# Altium PCB PCB1.PcbDoc
Units mil, origin at the board's own origin, x right, y up, seen from the top; angles counter-clockwise.
Board outline 3680 x 3715 mil, 2 copper layers (Top Layer, Bottom Layer); 18 components, 40 nets, 133 pads, 30 vias.
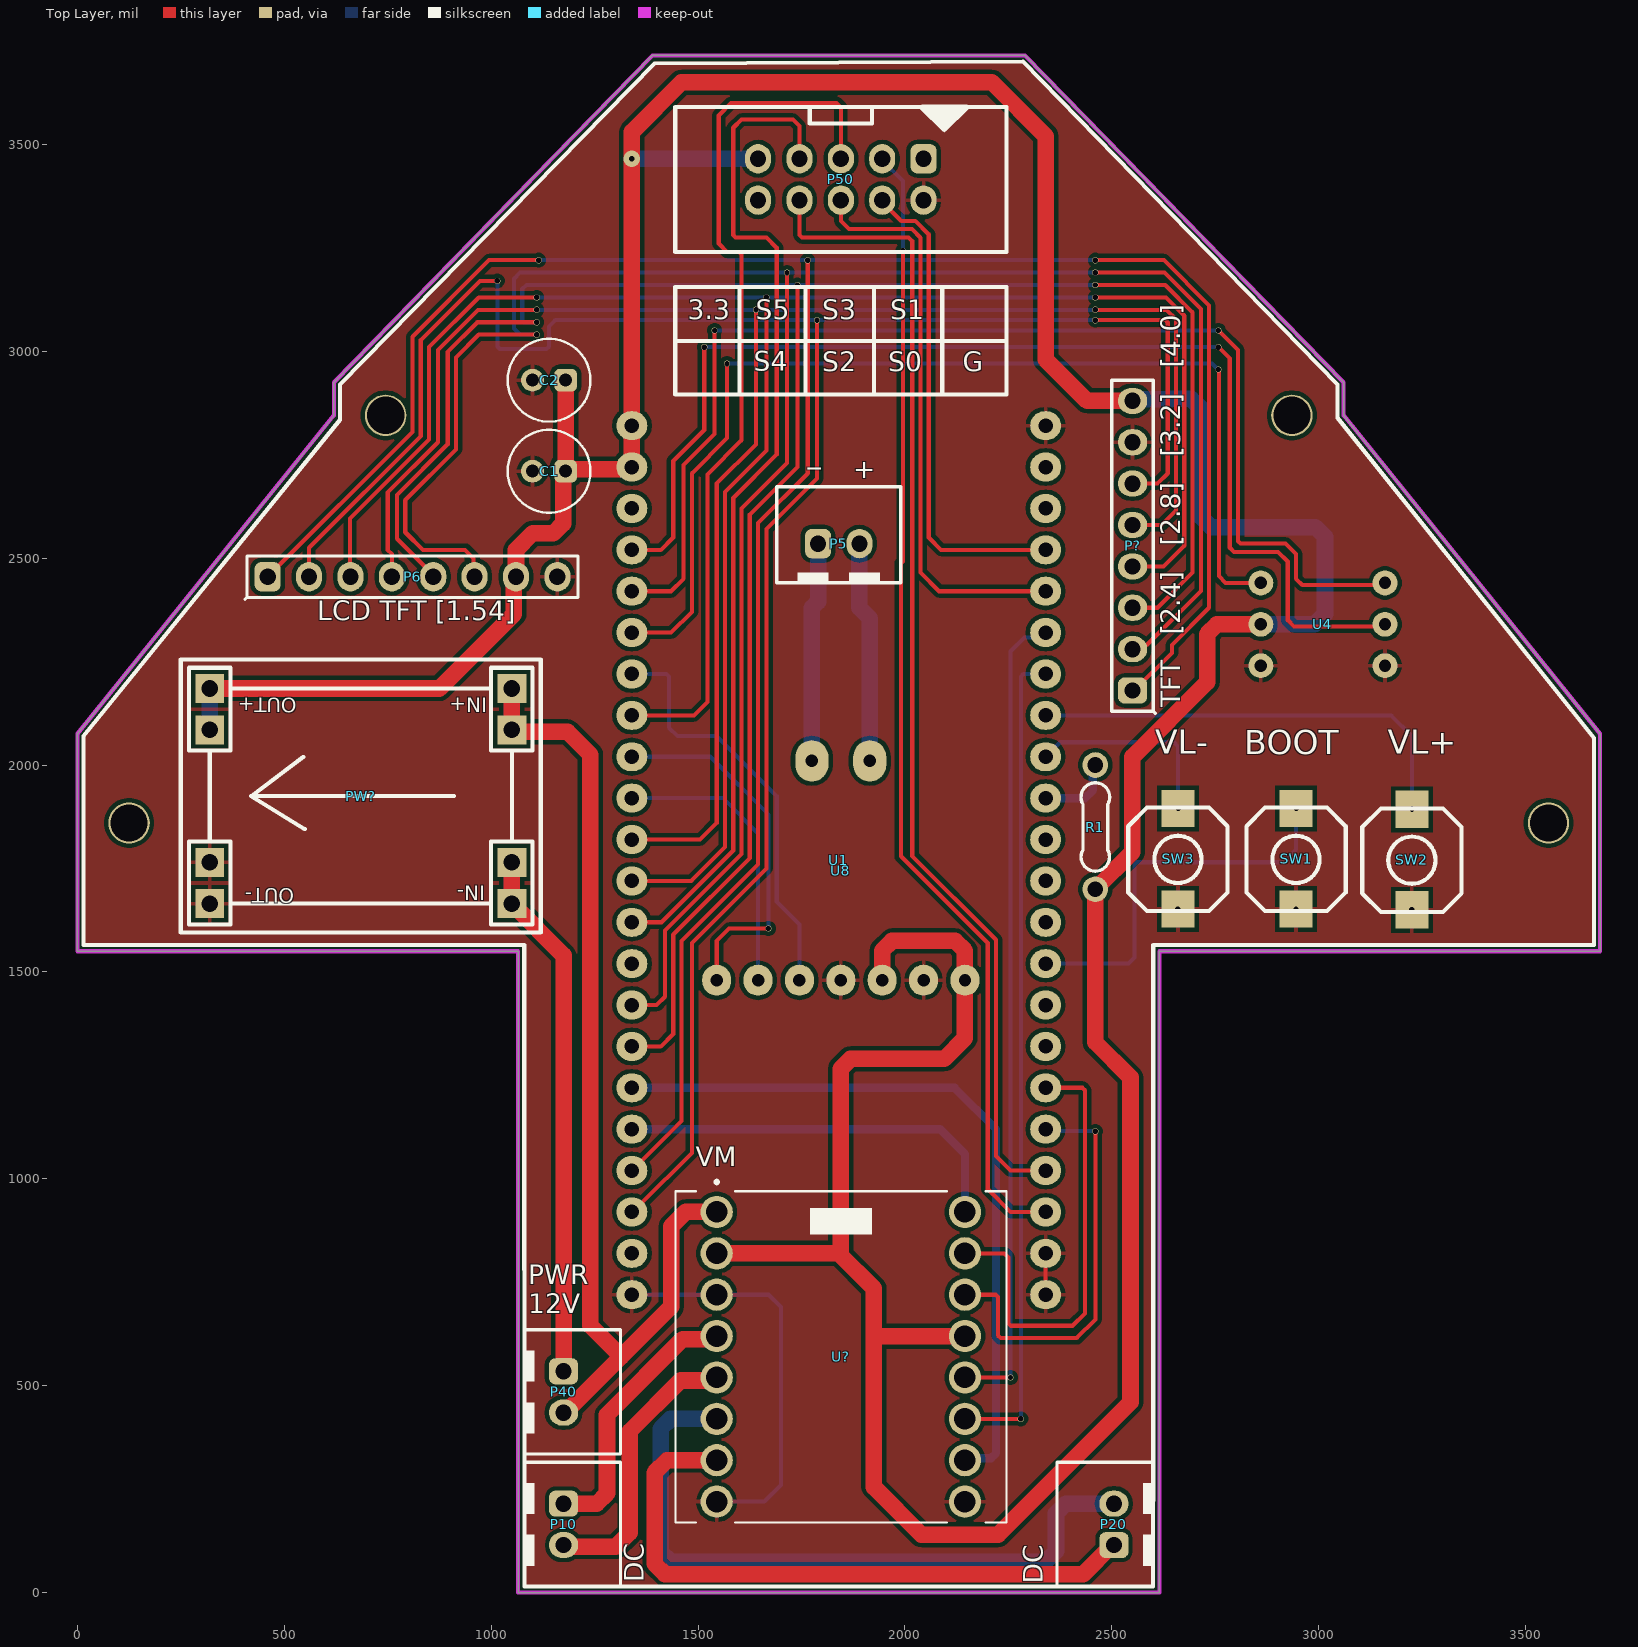
[diagram p0: Top Layer view]
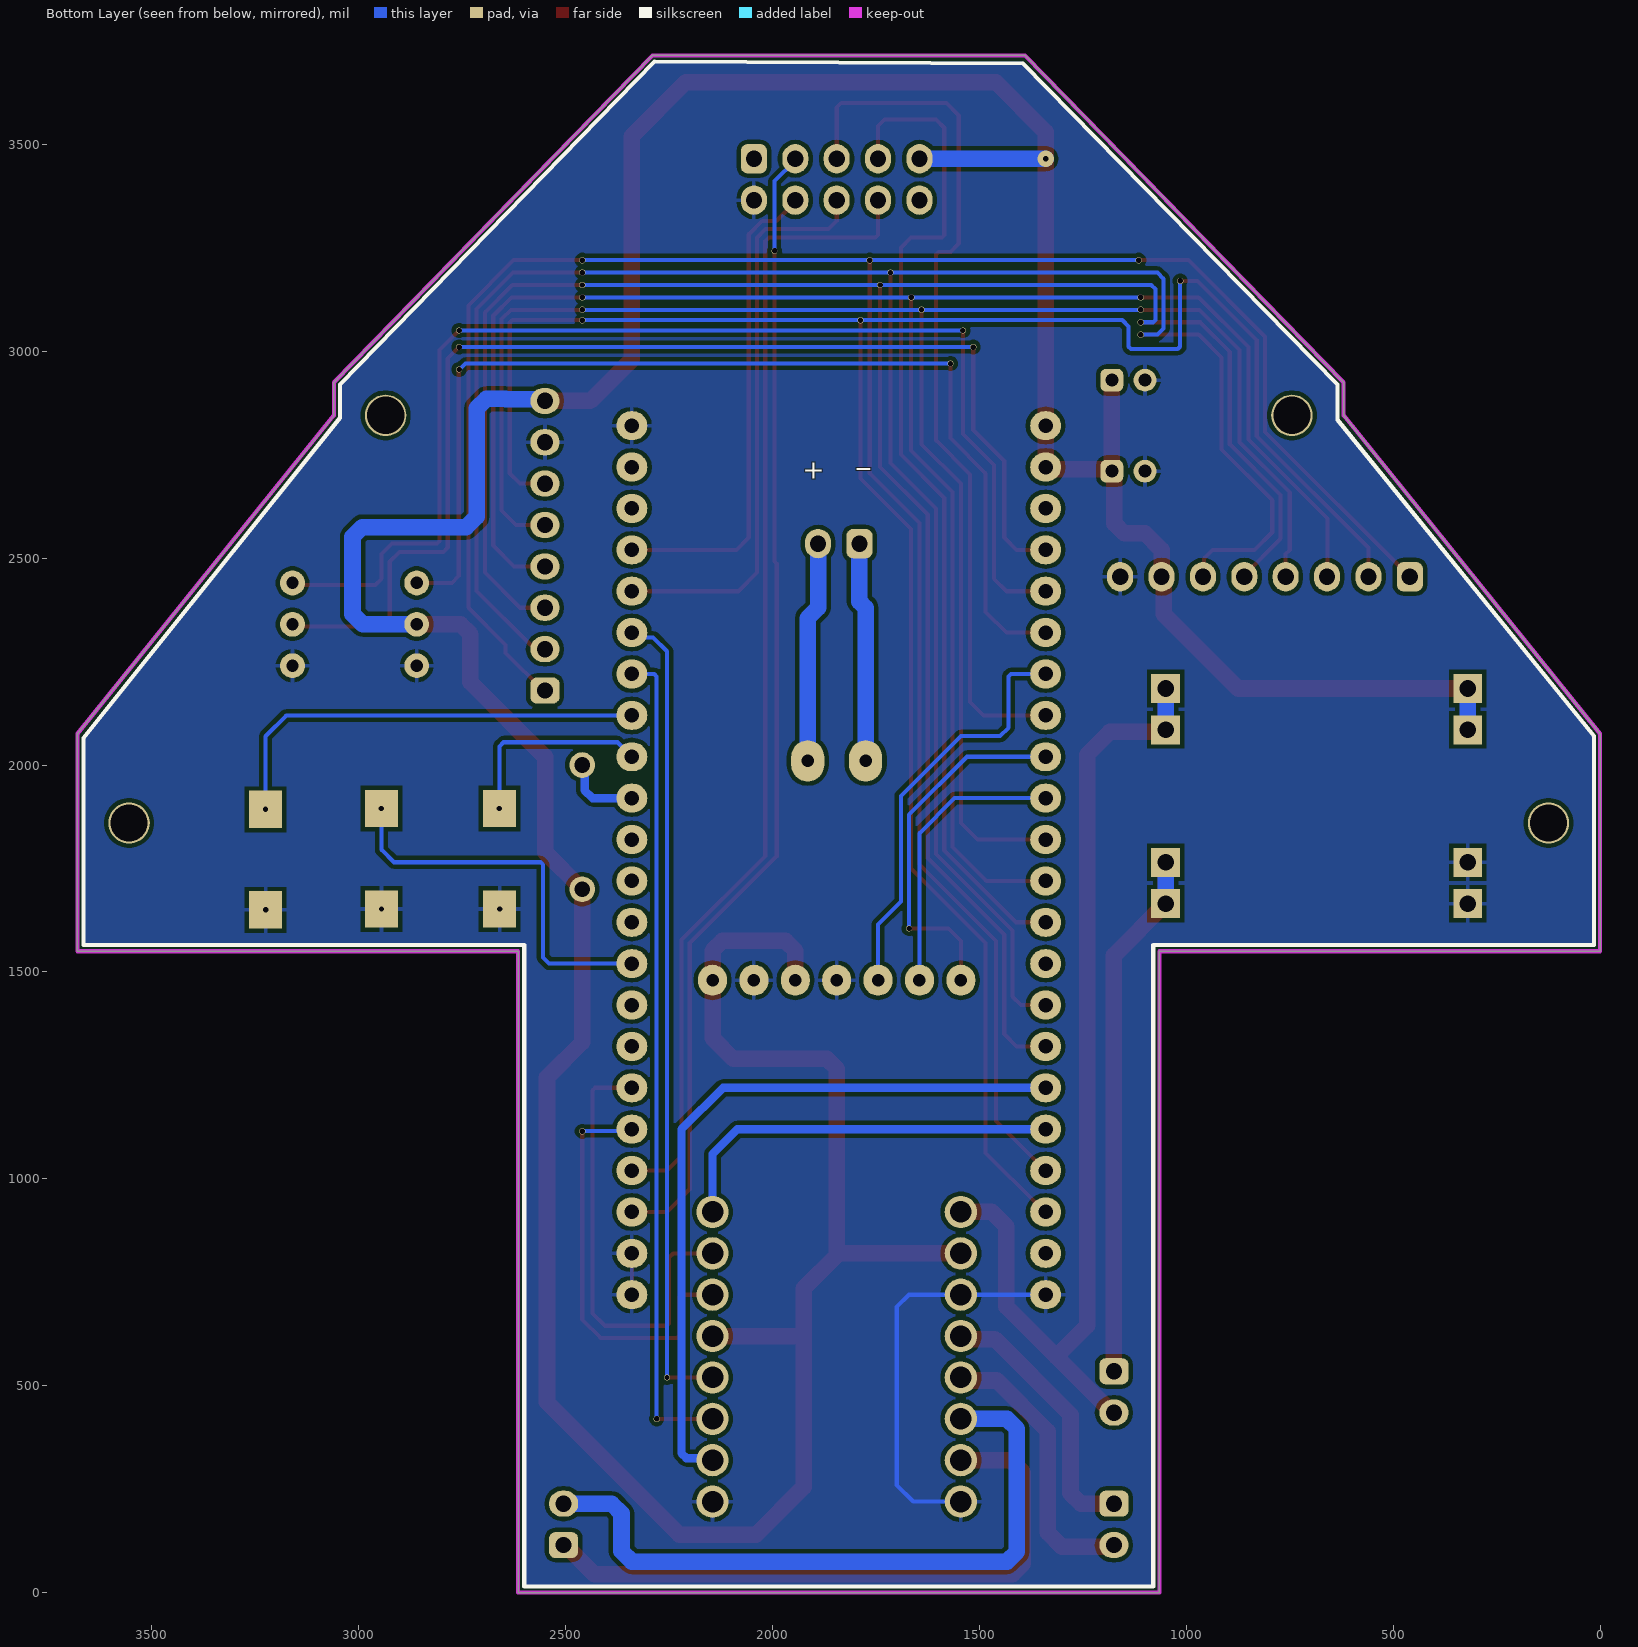
[diagram p1: Bottom Layer view, seen from below]

## Layer stack, top to bottom
Top Solder: solder mask 0.4, Solder Resist, Dk 3.5
Top Layer: signal copper 1.4
Dielectric 1: dielectric 12.6, FR-4, Dk 4.8
Bottom Layer: signal copper 1.4
Bottom Solder: solder mask 0.4, Solder Resist, Dk 3.5

## Board outline
0,1550 1065,1550 1065,0 2615,0 2615,1550 3680,1550 3680,2075 3060,2845 3060,2925 2290,3715 1390,3715 620,2925 620,2845 0,2075

## Design rules (kind name [scope] priority, off if disabled: settings)
Clearance [All] p1: gap=10 ignorepadtopadclearanceinfootprint=FALSE except(0: Arc-Hole Track-Hole SMDPad-Hole THPad-Hole Via-Hole Fill-Hole Poly-Hole Region-Hole Text-Hole)
PolygonConnect [All] p1: connectstyle=Relief reliefconductorwidth=10 reliefentries=4 polygonreliefangle="90 Angle" airgapwidth=10
RoutingVias [All] p1: holewidth=13 width=15 viastyle="Through Hole" minholewidth=13 minwidth=15 maxholewidth=13 maxwidth=15
SolderMaskExpansion [IsVia] p1: expansion=-1 istentingtop=FALSE
Width [All] p1: maxlimit=40 minlimit=10 preferedwidth=20
30 further rules are at their usual default settings.

## Components (designator, comment, footprint, x,y, rotation, side; value= is the part's Value field where it differs from the comment)
C1 "C" CYL/D.200/LS.75 1140,2710 r180 top
C2 "C" CYL/D.200/LS.75 1140,2930 r180 top
P5 "LOA" HDR/Header/2/BOX 1840,2535 r90 top
P6 "Header 8" HDR/Header/8 810,2455 r0 top
P10 "MOTORA" HDR/Header/2/BOX 1175,165 r0 top
P20 "MOTORB" HDR/Header/2/BOX 2505,165 r180 top
P40 "POWER" HDR/Header/2/BOX 1175,485 r0 top
P50 "BOX SENSOR" HDR/Header/10/DL/BOX 1845,3415 r0 top
P? "Header 8" HDR/Header/8 2550,2530 r90 top
PW? "MP1584" MP1548 1050,2185 r180 top
R1 "10K" "R 1/4W/300" 2460,1700 r90 top
SW1 "Button 2pin" Button2Psilicon 2945,1652.05 r90 top
SW2 "Button 2pin" Button2Psilicon 3225,1650 r90 top
SW3 "Button 2pin" Button2Psilicon 2659.63,1652.05 r90 top
U1 "ESP32_S3_MODULE" ESP32_S3_MODULE 1340,720 r90 top
U4 "MIC_IMP441" IMP441 2860,2440 r0 top
U8 "MAX98357" MAX98357 1545,1480 r0 top
U? "ROB-14450" MODULE_ROB-14450 1845,570 r0 top

## Footprints (in the part's own frame and the unit in brackets; to place one, negate y for a bottom-side part, rotate by r counter-clockwise, add the part's x,y. Pads: shape width x height; smd on the part's side, far side on the other; paste and mask are expansions set on the pad)
Button2Psilicon [mil]
  rect 90x80 hole 13: 1(0,0) 2(242.95,-0.37)
  silkscreen extent -5,-120 245,120, body extent -4,-116 244,116, height 195
CYL/D.200/LS.75 [mm]
  rrect50% 1.4x1.4 hole 0.8: 1(-1.016,0)
  round 1.4 hole 0.8: 2(1.016,0)
  silkscreen extent -2.54,-2.54 2.54,2.54, body extent -2.5,-2.5 2.5,2.5, height 11
ESP32_S3_MODULE [mil]
  oval 70x75 hole 35: 0(0,0) 1(100,0) 2(200,0) 3(300,0) 4(400,0) 5(500,0) 6(600,0) 7(700,0) 8(800,0) 9(900,0) 10(1000,0) 11(1100,0) 12(1200,0) 13(1300,0) 14(1400,0) 15(1500,0) 16(1600,0) 17(1700,0) 18(1800,0) 19(1900,0) 20(2000,0) 21(2100,0) 22(0,-1000) 23(100,-1000) 24(200,-1000) 25(300,-1000) 26(400,-1000) 27(500,-1000) 28(600,-1000) 29(700,-1000) 30(800,-1000) 31(900,-1000) 32(1000,-1000) 33(1100,-1000) 34(1200,-1000) 35(1300,-1000) 36(1400,-1000) 37(1500,-1000) 38(1600,-1000) 39(1700,-1000) 40(1800,-1000) 41(1900,-1000) 42(2000,-1000) 43(2100,-1000)
  body extent -100,-1050 2421,50, height 426
HDR/Header/2/BOX [mm]
  rrect50% 1.8x1.6 hole 1: 1(0,1.27)
  oval 1.8x1.6 hole 1: 2(0,-1.27)
  silkscreen extent -2.41,-3.81 3.5,3.81, body extent -2.35,-3.7 3.4,3.7, height 7
HDR/Header/8 [mm]
  rrect50% 1.6x1.8 hole 1: 1(-8.89,0)
  oval 1.6x1.8 hole 1: 2(-6.35,0) 3(-3.81,0) 4(-1.27,0) 5(1.27,0) 6(3.81,0) 7(6.35,0) 8(8.89,0)
  silkscreen extent -10.29,-1.4 10.16,1.27, body extent -10.16,-1.27 10.16,1.27, height 8.89
HDR/Header/10/DL/BOX [mm] "10 pins Male Box Header, IDC Socket"
  rrect50% 1.6x1.8 hole 1: 1(5.08,1.27)
  oval 1.6x1.8 hole 1: 2(5.08,-1.27) 3(2.54,1.27) 4(2.54,-1.27) 5(0,1.27) 6(0,-1.27) 7(-2.54,1.27) 8(-2.54,-1.27) 9(-5.08,1.27) 10(-5.08,-1.27)
  silkscreen extent -10.16,-4.44 10.16,4.58, body extent -10.16,-4.81 10.16,4.66, height 9.27
IMP441 [mil]
  round 60 hole 30: 0(0,0) 1(0,-100) 2(0,-200) 3(300,0) 4(300,-100) 5(300,-200)
  body extent -122,-382 420,178, height 411
MAX98357 [mil]
  oval 70x75 hole 30: 0(0,0) 1(100,0) 2(200,0) 3(300,0) 4(400,0) 5(500,0) 6(600,0)
  oval 80x100 hole 30: 7(230,530) 8(370,530)
  body extent -54,-99 654,665, height 656
MODULE_ROB-14450 [mm]
  round 1.98 hole 1.32: 1(-7.62,8.89) 2(-7.62,6.35) 3(-7.62,3.81) 4(-7.62,1.27) 5(-7.62,-1.27) 6(-7.62,-3.81) 7(-7.62,-6.35) 8(-7.62,-8.89) 9(7.62,-8.89) 10(7.62,-6.35) 11(7.62,-3.81) 12(7.62,-1.27) 13(7.62,1.27) 14(7.62,3.81) 15(7.62,6.35) 16(7.62,8.89)
  silkscreen extent -10.16,-10.16 10.16,10.83, body extent -10.16,-10.16 10.16,10.16, height 5.5
MP1548 [mil]
  rect 70x70 hole 40: 0(0,100) 0(0,0) 1(0,520) 1(0,420) 2(730,0) 2(730,100) 3(730,520) 3(730,420)
  silkscreen extent -70,-70 800,590, body extent -70,-71 800,591, height 161
"R 1/4W/300" [mil] "Through hole resitor, axial 300mils, 1/4W"
  round 62 hole 38: 1(0,0) 2(300,0)
  silkscreen extent 44,-35 257,35, body extent -12,-47 312,47, height 97

## Part data
C1 C2: library part Capacitor, "Capacitor pol"
P5 P10 P20 P40: library part "Header 2", "Header, 2-Pin"
P6 P?: "Header, 8-Pin"
P50: library part "Header 5X2", "Header, 5-Pin, Dual row"
R1: library part Resistor, "Resistor"
SW1 SW2 SW3: library part "Silicone 2P button SMD"
U?: "TB6612FNG Motor Controller/Driver Power Management Evaluation Board", Package=None, Availability="In Stock", Check_prices=https://www.snapeda.com/parts/ROB-14450/SparkFun%20Electronics/view-part/2656367/?ref=eda, MF="SparkFun Electronics", MP=ROB-14450, Price=None, SnapEDA_Link=https://www.snapeda.com/parts/ROB-14450/SparkFun%20Electronics/view-part/2656367/?ref=snap

## Free pads (board coordinates)
  round 100 hole 90: 70(745,2845) 71(2935,2845) 76(125,1860) 77(3555,1860)

## Via types
v1: diameter 15, hole 13, Top Layer to Bottom Layer, 29 vias
v2: diameter 40, hole 13, Top Layer to Bottom Layer, 1 vias

## Nets (pads, with @x,y where several pads share a name; then routed paths per layer and width w, separated by ;. In a path a pad name is that pad's centre, name@x,y a point inside that pad or via, vN(x,y) a via of type N, cw(c..) or ccw(c..) an arc to the next point about the centre after c; other vN are vias at no path point)
3.3: C1.1 C2.1 P6.7 P50.9 P?.8 PW?.2 R1.1 U1.20 U1.21 U4.1 U8.4 U8.6 U?.2 U?.13 | length 11194
  Top Layer w40: PW?.2@320,2185 875,2185 1055,2365 1055,2429.81 1055.6,2430.41 1055.6,2450.6 P6.7 ; P6.7@1050,2455 1060,2465 1060,2520 1100,2560 1150.58,2560 1174.01,2583.43 1174.01,2704.01 C1.1 ; C2.1@1175,2925 C2.1 C1.1 ; U?.2 1840,820 ; U8.4 1945,1551.57 1968.43,1575 2121.57,1575 2145,1551.57 2145,1340 2095,1290 1868.43,1290 1845,1266.57 1845,825 1840,820 ; U?.13 1930,620 1925,625 ; P?.8 2460,2880 2440,2880 2340,2980 2340,3520 2210,3650 1460,3650 1340,3530 v2(1340,3465) U1.21 U1.20 1335,2715 1185,2715 C1.1 ; U4.1 2753.43,2340 2730,2316.57 2730,2200 2549.6,2019.6 2549.6,1789.6 R1.1 2460,1330 2545,1245 2545,460 2225,140 2040,140 1925,255 1925,625 ; 1840,820 1925,735 1925,625
  Bottom Layer w40: PW?.2@320,2085 PW?.2@320,2185 ; v2(1340,3465) P50.9 ; P?.8 2554.4,2884.4 2644.56,2884.4 2645.16,2885 2691.57,2885 2715,2861.57 2715,2600 2740,2575 2991.57,2575 3015,2551.57 3015,2365 2990,2340 U4.1
+12: P40.2 PW?.0 U?.1 | length 2584.7
  Top Layer w40: PW?.0@1050,2185 1050,2085 1055,2080 1185,2080 1240,2025 1240,645 1314.47,570.53 ; P40.2 1178.94,435 1314.47,570.53 ; U?.1 1470,920 1435,885 1435,691.06 1314.47,570.53
  Bottom Layer w40: PW?.0@1050,2085 PW?.0@1050,2185
AI1: U1.26 U?.14 | length 1008.8
  Top Layer w10: U?.14 2219.14,720 2225,714.14 2225,620.86 2230.86,615 2415,615 2460,660 v1(2460,1115)
  Bottom Layer w10: U1.26 2344.04,1115.96 2459.04,1115.96 v1(2460,1115)
AI2: U1.27 U?.15 | length 1104.7
  Top Layer w10: U?.15 2240,820 2250,810 2250,650.86 2255.86,645 2405,645 2435,675 2435,1214.14 2429.14,1220 U1.27
BCK: U1.12 U8.1 | length 695.2
  Bottom Layer w10: U1.12 1560,1920 1645,1835 U8.1
BI1: U1.38 U?.12 | length 1968.6
  Top Layer w10: U?.12 v1(2255,520)
  Bottom Layer w10: v1(2255,520) 2255,2275 2288.52,2308.52 2328.52,2308.52 U1.38
BI2: U1.37 U?.11 | length 1991.6
  Top Layer w10: U?.11 v1(2280,420)
  Bottom Layer w10: v1(2280,420) 2280,2214.14 2285.86,2220 U1.37
BL: P6.1 P?.1 U1.3 | length 6171.6
  Top Layer w10: P6.1@450,2445 P6.1 810,2805 810,3035 995,3220 v1(1115,3220) ; U1.3 1460,1140 1460,1575 1645,1760 1645,2585 1765,2705 v1(1765,3220) ; v1(2460,3220) 2625.56,3220 2735,3110.56 2735,2380 2645,2290 2645,2271.06 2553.94,2180 P?.1
  Bottom Layer w10: v1(1115,3220) v1(1765,3220) v1(2460,3220)
BOOT: SW1.2 U1.30 | length 950.4
  Bottom Layer w10: U1.30 2540,1520 2555,1535 2555,1759.14 2560.86,1765 2915,1765 2945.37,1795.37 SW1.2
CS: P6.2 P?.6 U1.2 | length 5611.3
  Top Layer w10: P6.2 560,2525 830,2795 830,3026.72 973.28,3170 v1(1015,3170) ; U1.2 1360,920 1360,937.5 1485,1062.5 1485,1570 1665,1750 1665,2570 1787.5,2692.5 v1(1787.5,3075) ; v1(2460,3075) 2629.14,3075 2635,3069.14 2635,2705 2610,2680 P?.6 P?.6@2520,2680
  Bottom Layer w10: v1(1015,3170) 1015,3010.86 1020.86,3005 1134.14,3005 1140,3010.86 1140,3060 1155,3075 v1(1787.5,3075) v1(2460,3075)
DC: P6.3 P?.4 U1.10 | length 4887.5
  Top Layer w10: P6.3 659.14,2455.86 659.14,2595.86 850,2786.72 850,3010 970,3130 v1(1110,3130) ; U1.10 1483.43,1720 1565,1801.57 1565,2660 1665,2760 v1(1665,3130) ; v1(2460,3130) 2630.71,3130 2675,3085.71 2675,2530 2625,2480 P?.4 P?.4@2520,2480
  Bottom Layer w10: v1(1110,3130) v1(1665,3130) v1(2460,3130)
DIN: U1.15 U8.2 | length 1012.7
  Bottom Layer w10: U1.15 1424.14,2220 1430,2214.14 1430,2090 1450,2070 1545,2070 1690,1925 1690,1670 1745,1615 U8.2
GND: C1.2 C2.2 P6.8 P50.2 P?.7 PW?.3 SW1.1 SW2.1 SW3.1 U1.0 U1.22 U1.23 U1.43 U4.2 U4.5 U8.3 U8.5 U?.3 U?.8 U?.9 | length 1074
  Top Layer w10: U1.22 U1.23
  Bottom Layer w10: U1.0 U?.3 1670,720 1700,690 1700,260 1660,220 U?.8
GPIO_46: U1.8
GPIO_48: U1.28
LCK: U1.13 U8.0 | length 895.4
  Top Layer w10: U8.0 1545,1575 1575,1605 v1(1670,1605)
  Bottom Layer w10: U1.13 1530,2020 1670,1880 v1(1670,1605)
LOA+: P5.2 U8.8 | length 535.4
  Bottom Layer w40: P5.2 1890,2380 1915,2355 U8.8
LOA-: P5.1 U8.7 | length 531.2
  Bottom Layer w40: U8.7 1775,2380 1790,2395 P5.1
MIC_SCK: U1.17 U4.3 | length 2950.9
  Top Layer w10: U1.17 1435,2420 1465,2450 1465,2725 1540,2800 v1(1540,3050) ; v1(2757.5,3050) 2805,3002.5 2805,2540.86 2810.86,2535 2920,2535 2945,2510 2945,2450 2960,2435 3155,2435 U4.3
  Bottom Layer w10: v1(1540,3050) v1(2757.5,3050)
MIC_SD: U1.16 U4.0 | length 2602.3
  Top Layer w10: U1.16 1435,2320 1485,2370 1485,2705 1570,2790 v1(1570,2970) ; v1(2757.5,2955.68) 2758.46,2954.72 2758.46,2456.54 2775,2440 U4.0
  Bottom Layer w10: v1(1570,2970) 2741.83,2970 2756.15,2955.68 v1(2757.5,2955.68)
MIC_WS: U1.18 U4.4 | length 2881.2
  Top Layer w10: U1.18 1410,2520 1440,2550 1440,2735 1515,2810 v1(1515,3010) ; v1(2757.5,3010) 2785,2982.5 2785,2525 2795,2515 2901.72,2515 2925,2491.72 2925,2350 2940,2335 3155,2335 U4.4
  Bottom Layer w10: v1(1515,3010) v1(2757.5,3010)
NetP10_1: P10.1 U?.4 | length 649.1
  Top Layer w40: P10.1 1255,215 1280,240 1280,430 1462.74,612.74 1537.74,612.74 U?.4
NetP10_2: P10.2 U?.5 | length 684.9
  Top Layer w40: P10.2 1179.4,110.6 1300.6,110.6 1335,145 1335,390 1457.74,512.74 1537.74,512.74 U?.5
NetP20_1: P20.1 U?.7 | length 1531.8
  Top Layer w40: U?.7 1425,320 1395,290 1395,70 1420,45 2431.06,45 2501.06,115 P20.1
NetP20_2: P20.2 U?.6 | length 1659.2
  Bottom Layer w40: U?.6 1433.43,420 1410,396.57 1410,98.43 1433.43,75 2340,75 2365,100 2365,191.57 2388.43,215 P20.2
NetP40_1: P40.1 PW?.1 | length 1381.8
  Top Layer w40: PW?.1@1050,1765 1050,1665 1175,1540 P40.1
  Bottom Layer w40: PW?.1@1050,1665 PW?.1@1050,1765
NetR1_2: R1.2 U1.34 | length 185.4
  Bottom Layer w20: U1.34 2435,1920 2454,1939 2454,1994 R1.2
PWMA: U1.4 U?.16 | length 969.9
  Bottom Layer w20: U1.4 2085,1120 2145,1060 U?.16
PWMB: U1.5 U?.10 | length 1786.6
  Bottom Layer w20: U1.5 2120,1220 2220,1120 2220,336.72 2208.28,325 2150,325 U?.10
RST: P6.4 P?.5 U1.11 | length 4548.5
  Top Layer w10: P6.4 760,2510 750,2520 750,2658.43 871.64,2780.07 871.64,3003.36 968.28,3100 v1(1110,3100) ; U1.11 1505,1820 1545,1860 1545,2680 1640,2775 v1(1640,3100) ; v1(2460,3100) 2632.43,3100 2655,3077.43 2655,2615 2620,2580 P?.5@2520,2580
  Bottom Layer w10: v1(1110,3100) v1(1640,3100) v1(2460,3100)
S0: P50.4 U1.40 | length 1176.4
  Top Layer w10: P50.4 1945,3361.06 1991.06,3315 2025,3315 2057.5,3282.5 2057.5,2550 2087.5,2520 U1.40
S1: P50.3 U1.24 | length 2762.5
  Top Layer w10: v1(1995,3242.5) 1995,2491.82 1990,2486.82 1990,1779.5 2200,1569.5 2200,975 2255,920 U1.24
  Bottom Layer w10: P50.3 1945,3461.06 1995,3411.06 v1(1995,3242.5)
S2: P50.6 U1.39 | length 1390
  Top Layer w10: P50.6 1845,3314.57 1864.57,3295 2016.72,3295 2037.5,3274.22 2037.5,2465 2082.5,2420 U1.39
S3: P50.5 U1.14 | length 2123.6
  Top Layer w10: U1.14 1490,2120 1522.5,2152.5 1522.5,2702.5 1605,2785 1605,3234.14 1599.14,3240 1570,3240 1550,3260 1550,3570 1580,3600 1834.14,3600 1845,3589.14 P50.5
S4: P50.8 U1.25 | length 2792.1
  Top Layer w10: P50.8 1745,3280.86 1750.86,3275 2008.43,3275 2017.5,3265.93 2017.5,1780.28 2220,1577.78 2220,1055 2255,1020 U1.25
S5: P50.7 U1.9 | length 2447.9
  Top Layer w10: U1.9 1411.72,1620 1585,1793.28 1585,2645 1690,2750 1690,3250 1665,3275 1590.86,3275 1585,3280.86 1585,3540 1605,3560 1729.14,3560 1745,3544.14 P50.7
SCL: P6.6 P?.2 U1.7 | length 5699.7
  Top Layer w10: P6.6 957.49,2457.51 957.49,2499.58 937.06,2520 835,2520 792.43,2562.57 792.43,2640 915,2762.57 915,2985 970,3040 v1(1110,3040) ; U1.7 1400,1420 1420,1440 1420,1600 1605,1785 1605,2620 1715,2730 v1(1715,3190) ; v1(2460,3190) 2627.28,3190 2715,3102.28 2715,2420.86 2584.28,2290.14 2530.14,2290.14 P?.2@2525,2285
  Bottom Layer w10: v1(1110,3040) 1070,3040 1055,3055 1055,3175 1070,3190 v1(1715,3190) v1(2460,3190)
SDA: P6.5 P?.3 U1.6 | length 5524.1
  Top Layer w10: P6.5 860,2459.21 772.43,2546.78 772.43,2652.57 895,2775.15 895,2998.43 966.57,3070 v1(1110,3070) ; U1.6 1410,1320 1440,1350 1440,1590 1625,1775 1625,2605 1740,2720 v1(1740,3160) ; v1(2460,3160) 2628.99,3160 2695,3093.99 2695,2465 2610,2380 P?.3 P?.3@2520,2380
  Bottom Layer w10: v1(1110,3070) 1080.86,3070 1075,3075.86 1075,3150 1085,3160 v1(1740,3160) v1(2460,3160)
VL+: SW2.2 U1.36 | length 1082.9
  Bottom Layer w10: U1.36 3175,2120 3225.37,2069.63 SW2.2
VL-: SW3.2 U1.35 | length 488.6
  Bottom Layer w10: U1.35 2375,2055 2650,2055 2660,2045 SW3.2
pads on no net: P50.1 P50.10 U1.1 U1.19 U1.29 U1.31 U1.32 U1.33 U1.41 U1.42

## Polygon pours and split planes (outlines as drawn)
GND on Top Layer "NONET_L-01_P-001" (solid, remove dead copper, pour order 0): -470,4520 -110,4160 4890,4160 4890,-1050 4470,-1470 3910,-910 -1310,-910
GND on Bottom Layer "NONET_L-01_P-001" (solid, remove dead copper, pour order 1): -480,4030 -220,3770 5315,3770 5315,965 3865,-485 -785,-485

## Keep-outs
Keep-Out Layer:
  lines w10: 0,1550 1065,1550 1065,0 2615,0 2615,1550 3425,1550 3680,1550 3680,2075 3060,2845 3060,2925 2290,3715 1390,3715 620,2925 620,2845 0,2075 0,1550

## Silkscreen, mask and mechanical layers (free items; w line width, h text height)
Top Overlay:
  rectangle: 1770,865 1920,930
  lines w10: 1445,3025 2245,3025 ; 1600,2900 1600,3155 ; 1760,2895 1760,3155 ; 1925,2895 1925,3155 ; 2090,2895 2090,3155 ; 15,1565 1080,1565 1080,1540 1080.51,15 2599.49,15 2600,425 2600,1565 2725,1565 3665,1565 3665,2065 3045,2840 3045,2920 2285,3700 1395,3695 635,2920 635,2835 15,2070 15,1565 ; 1445,2895 1445,2925 1445,3155 1465,3155 2245,3155 2245,2895 1445,2895
  text "3.3" at 1475,3061.61 h80
  text "S5" at 1640,3060.94 h80
  text "S3" at 1800,3060.94 h80
  text "S1" at 1965,3060.94 h80
  text "S4" at 1635,2936.61 h80
  text "S2" at 1800,2935.94 h80
  text "S0" at 1960,2935.94 h80
  text "G" at 2140,2935.94 h80
  text "_" at 1765,2714.15 h80
  text "+" at 1875,2677.62 h80
  text "LCD TFT [1.54]" at 580,2334.43 h80
  text "TFT   [2.4]   [2.8]   [3.2]   [4.0]" at 2680.57,2140 h80 r90
  text "VL-" at 2605,2008 h100
  text "VL+" at 3166.86,2008 h100
  text "BOOT" at 2820,2006.96 h100
  text "VM" at 1495,1015 h80
  text "PWR" at 1090,730 h80
  text "12V" at 1090,660 h80
  text "DC" at 1384.11,25 h80 r90
  text "DC" at 2349.1,22.06 h80 r90
Bottom Overlay:
  lines w10: 15,1565 1080,1565 1080,15 2600,15 2600,1565 3665,1565 3665,2065 3045,2840 3045,2920 2285,3700 1395,3695 635,2920 635,2835 15,2070 15,1565
  text "_" at 1763.48,2712.45 h80
  text "+" at 1873.48,2675.92 h80

## Text inside footprints (layer, text, board x,y; h text height)
PW?: Top Overlay "IN+" at 990,2175 h60 r180; Top Overlay "IN-" at 985.46,1720.14 h60 r180; Top Overlay "OUT+" at 530,2174.29 h60 r180; Top Overlay "OUT-" at 523.77,1714.42 h60 r180